# Altium PCB PCB1.PcbDoc (part 1 of 2)
Units mm, origin at the board's own origin, x right, y up, seen from the top; angles counter-clockwise.
Board outline 128 x 71 mm, 2 copper layers (Top Layer, Bottom Layer); 104 components, 107 nets, 531 pads, 522 vias.
Unrouted connection lines stored in the file: 53.
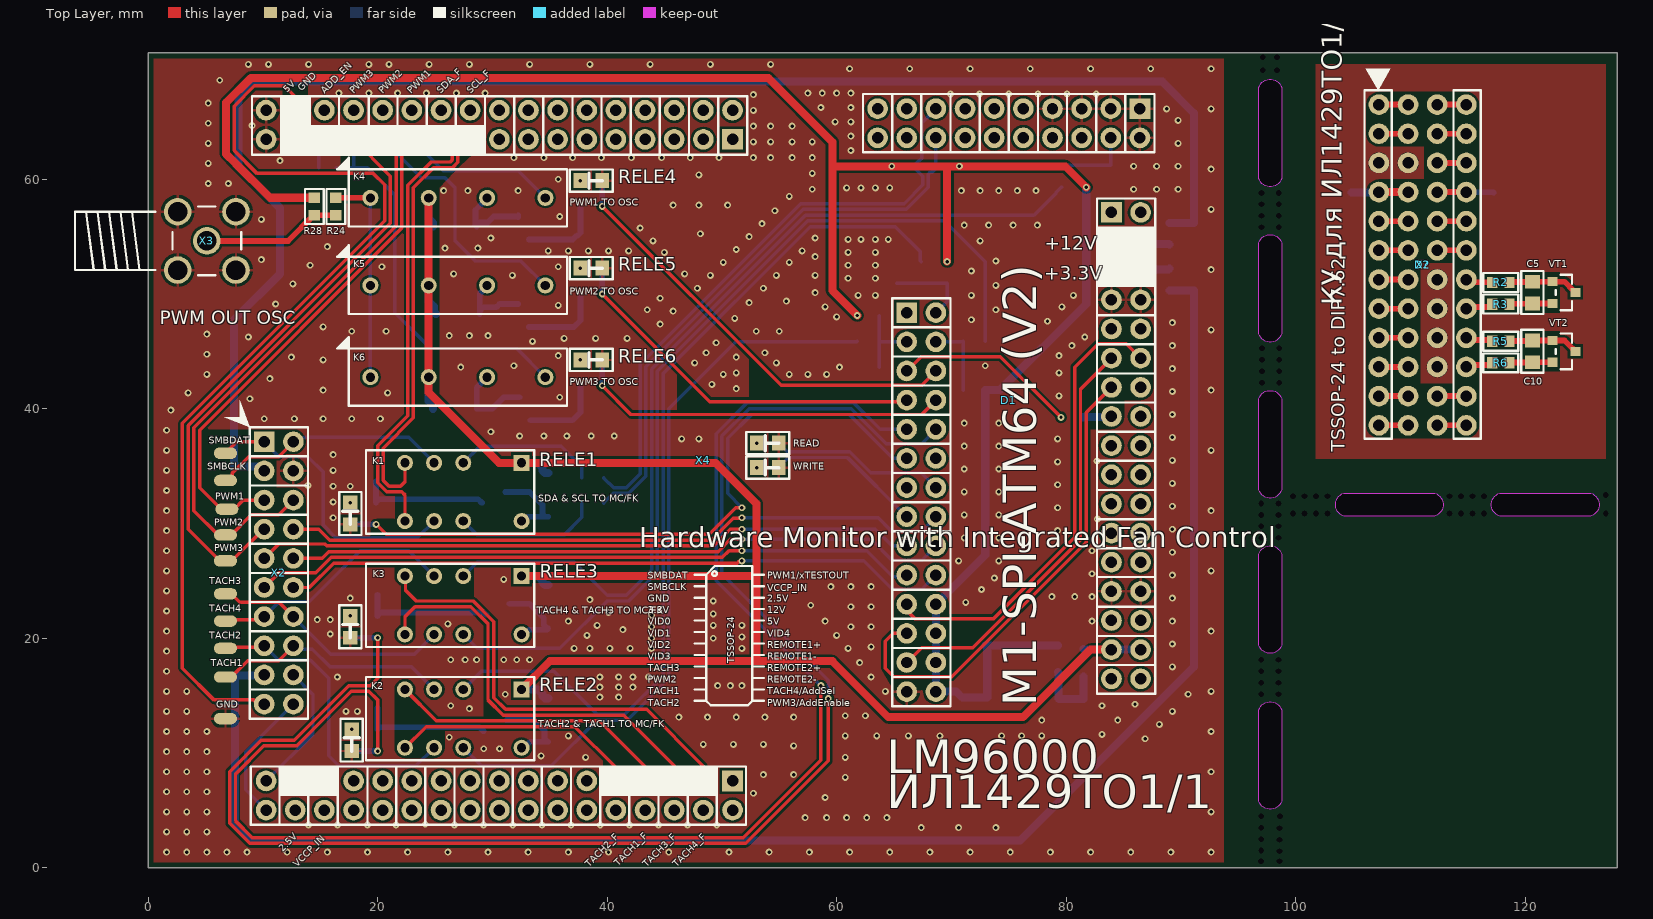
[diagram p0: Top Layer view]
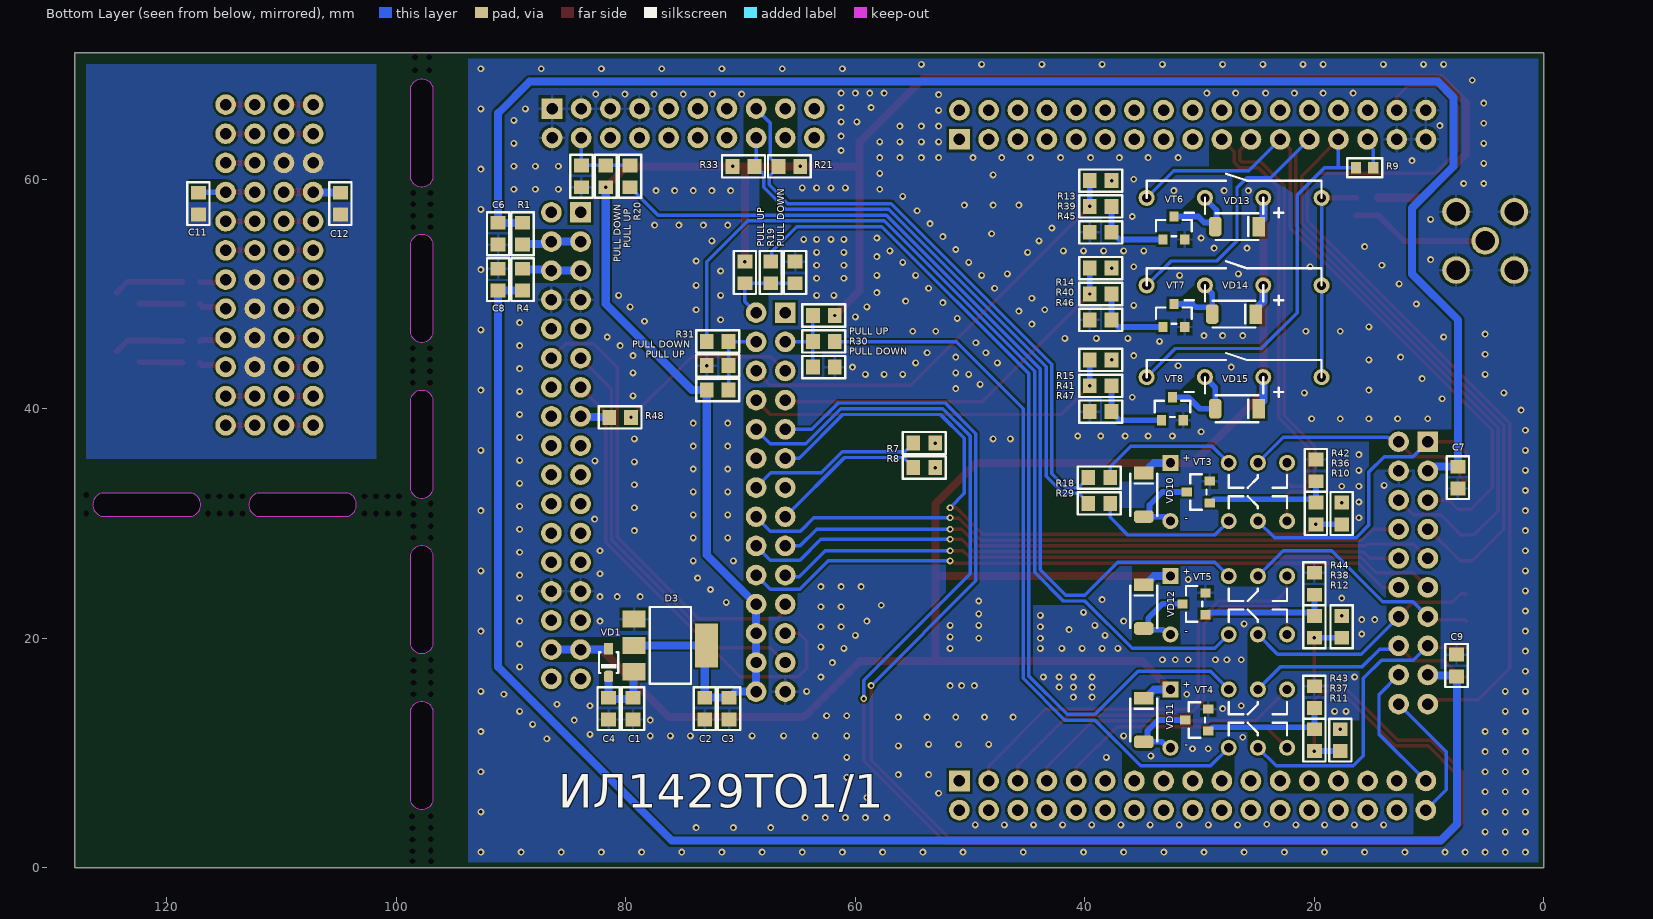
[diagram p1: Bottom Layer view, seen from below]

## Layer stack, top to bottom
Top Solder: solder mask 0.0102, Solder Resist, Dk 3.5
Top Layer: signal copper 0.0356
Dielectric 1: dielectric 0.32, FR-4, Dk 4.8
Bottom Layer: signal copper 0.0356
Bottom Solder: solder mask 0.0102, Solder Resist, Dk 3.5

## Board outline
0,0 128,0 128,71 0,71
cut-out: 125.717,32.643 cw(c125.375,31.643) 125.717,30.643 117.773,30.643 cw(c118.115,31.643) 117.773,32.643
cut-out: 112.127,32.643 cw(c111.785,31.643) 112.127,30.643 104.182,30.643 cw(c104.524,31.643) 104.182,32.643
cut-out: 98.778,19.398 cw(c97.778,19.74) 96.778,19.398 96.778,27.342 cw(c97.778,27) 98.778,27.342
cut-out: 98.778,5.807 cw(c97.778,6.149) 96.778,5.807 96.778,13.752 cw(c97.778,13.41) 98.778,13.752
cut-out: 98.778,32.932 cw(c97.778,33.274) 96.778,32.932 96.778,40.877 cw(c97.778,40.535) 98.778,40.877
cut-out: 98.778,60.057 cw(c97.778,60.399) 96.778,60.057 96.778,68.002 cw(c97.778,67.66) 98.778,68.002
cut-out: 98.778,46.523 cw(c97.778,46.865) 96.778,46.523 96.778,54.467 cw(c97.778,54.125) 98.778,54.467

## Design rules (kind name [scope] priority, off if disabled: settings)
Clearance [All] p1: gap=0.2 ignorepadtopadclearanceinfootprint=FALSE except(0: Arc-Hole Track-Hole SMDPad-Hole THPad-Hole Via-Hole Fill-Hole Poly-Hole Region-Hole Text-Hole)
ComponentClearance [All] p1: gap=0 collisioncheckmode=3 verticalgap=0 showdistances=FALSE
PolygonConnect [InNet('GND')] p1: thpad.connectstyle=Relief thpad.reliefconductorwidth=0.254 thpad.reliefentries=4 thpad.polygonreliefangle="90 Angle" thpad.airgapwidth=0.254 smdpad.connectstyle=Relief smdpad.reliefconductorwidth=0.254 smdpad.reliefentries=4 smdpad.polygonreliefangle="90 Angle" smdpad.airgapwidth=0.254 via.connectstyle=Direct via.reliefconductorwidth=0.254 via.reliefentries=4 via.polygonreliefangle="90 Angle" via.airgapwidth=0.254
RoutingVias [All] p1: holewidth=0.3 width=0.6 viastyle="Through Hole" minholewidth=0.3 minwidth=0.6 maxholewidth=0.6 maxwidth=1.2
SilkToSilkClearance [All] p1: silktosilkclearance=0
SilkToSolderMaskClearance [IsPad] p1: minsilkscreentomaskgap=0 clearancetoexposedcopper=TRUE
SolderMaskExpansion [All] p1: expansion=0.102 istentingtop=FALSE
Width [All] p1: maxlimit=0.7 minlimit=0.2 preferedwidth=0.3
27 further rules are at their usual default settings.

## Classes and differential pairs
component class UCP_s26: R48 X4
component class UCP_s25: K1 K2 K3 K4 K5 K6 R18 R19 R20 R21 R24 R27 R28 R29 R30 R31 R33 R34 R36 R37 R38 R39 R40 R41 R42 R43 R44 R45 R46 R47 s VD10 VD11 VD12 VD13 VD14 VD15 VT3 VT4 VT5 VT6 VT7 VT8
component class Sheet1: C1 C2 C3 C4 C5 C6 C7 C8 C9 C10 C11 C12 D1 D2 D3 KP1 KP2 KP3 KP4 KP5 KP6 KP7 KP8 KP9 KP10 R1 R2 R3 R4 R5 R6 R7 R8 R9 R10 R11 R12 R13 R14 R15 VD1 VD2 VD3 VD4 VD5 VD6 VD7 VD8 VD9 VT1 VT2 X1 X2 X3

## Components (designator, comment, footprint, x,y, rotation, side; value= is the part's Value field where it differs from the comment)
C1 "10uF" 0805 79.375,13.875 r270 bottom
C2 "0.1uF" 0805 73.125,13.875 r270 bottom
C3 "10uF" 0805 71,13.875 r270 bottom
C4 "0.1uF" 0805 81.5,13.875 r270 bottom
C5 "100pF" 0805 120.625,50.125 r270 top
C6 "10uF" 0805 91.125,55.25 r270 bottom
C7 "0.1uF" 0805 7.5,34 r270 bottom
C8 "10uF" 0805 91.125,51.25 r90 bottom
C9 "0.1uF" 0805 7.625,17.625 r90 bottom
C10 "100pF" 0805 120.625,45 r270 top
C11 "0.1uF" 0805 117.25,57.875 r270 bottom
C12 "0.1uF" 0805 104.875,57.875 r270 bottom
D1 "M1-SPI-ATM64(V2)" M1-SPI-ATM64(V2) 75,40.75 r270 top locked
D2 "LM96000" "TSSOP-24 DIP-7.62" 107.25,66.5 r0 top
D3 "LDO" SOT-223 76.125,19.375 r270 bottom
GND "Contact" Contact 6.75,13 r180 top (schematic designator KP6)
K1 "V23079A1001B301 TE" V23079A1001B301 26.25,32.75 r180 top locked
K2 "V23079A1001B301 TE" V23079A1001B301 26.25,13 r180 top locked
K3 "V23079A1001B301 TE" V23079A1001B301 26.25,22.875 r180 top locked
K4 "TRR1A05F00" TRR1A05F00 27,58.375 r0 top
K5 "TRR1A05F00" TRR1A05F00 27,50.75 r0 top
K6 "TRR1A05F00" TRR1A05F00 27,42.75 r0 top
"PULL DOWN" "DNP" 0805 72,43.75 r180 bottom (schematic designator R35)
"PULL DOWN" "DNP" 0805 62.75,43.625 r0 bottom (schematic designator R34)
"PULL DOWN" "DNP" 0805 83.875,60.25 r90 bottom (schematic designator R23)
"PULL DOWN" "DNP" 0805 65.25,51.875 r270 bottom (schematic designator R22)
"PULL UP" "DNP" 0805 72,41.625 r0 bottom (schematic designator R27)
"PULL UP" "DNP" 0805 62.75,48.125 r180 bottom (schematic designator R26)
"PULL UP" "DNP" 0805 81.75,60.25 r270 bottom (schematic designator R17)
"PULL UP" "DNP" 0805 69.625,51.875 r90 bottom (schematic designator R16)
PWM1 "Contact" Contact 6.875,31.25 r180 top (schematic designator KP3)
PWM2 "Contact" Contact 6.75,29 r180 top (schematic designator KP4)
PWM3 "Contact" Contact 6.75,26.75 r180 top (schematic designator KP5)
R1 "1" 0805 89,55.25 r90 bottom
R2 "SOLDER" 0603 117.875,51 r180 top
R3 "SOLDER" 0603 117.875,49.125 r180 top
R4 "1" 0805 89,51.25 r270 bottom
R5 "SOLDER" 0603 117.875,45.875 r180 top
R6 "SOLDER" 0603 117.875,44 r180 top
R7 "2.2k" 0805 54,37 r180 bottom
R8 "2.2k" 0805 54,34.875 r180 bottom
R9 "10k" 0603 15.625,61 r180 bottom
R10 "2.2k" 0805 17.625,30.875 r90 bottom
R11 "2.2k" 0805 17.75,11.125 r90 bottom
R12 "2.2k" 0805 17.625,21 r90 bottom
R13 "2.2k" 0805 38.625,59.875 r180 bottom
R14 "2.2k" 0805 38.625,52.25 r180 bottom
R15 "2.2k" 0805 38.625,44.25 r180 bottom
R18 "100" 0805 38.75,34 r0 bottom
R19 "100" 0805 67.375,51.875 r270 bottom
R20 "100" 0805 79.625,60.25 r90 bottom
R21 "10k" 0805 65.75,61.125 r180 bottom
R24 "100" 0603 16.375,57.625 r90 top
R28 "10k" 0603 14.5,57.625 r270 top
R29 "100" 0805 38.75,31.75 r0 bottom
R30 "100" 0805 62.75,45.875 r0 bottom
R31 "100" 0805 72,45.875 r180 bottom
R33 "10k" 0805 69.75,61.125 r0 bottom
R36 "1k" 0805 19.875,30.875 r90 bottom
R37 "1k" 0805 20,11.125 r90 bottom
R38 "1k" 0805 20,21 r90 bottom
R39 "1k" 0805 38.625,57.625 r180 bottom
R40 "1k" 0805 38.625,50 r180 bottom
R41 "1k" 0805 38.625,42 r180 bottom
R42 "20k" 0805 19.875,34.625 r90 bottom
R43 "20k" 0805 20,14.875 r90 bottom
R44 "20k" 0805 20,24.75 r90 bottom
R45 "20k" 0805 38.625,55.375 r0 bottom
R46 "20k" 0805 38.625,47.75 r0 bottom
R47 "20k" 0805 38.625,39.75 r0 bottom
R48 "100" 0805 80.5,39.25 r0 bottom
READ "LED(0805)" 0805(LED) 54,37 r0 top (schematic designator VD2)
RELE1 "LED(0805)" 0805(LED) 17.625,30.875 r270 top (schematic designator VD4)
RELE2 "LED(0805)" 0805(LED) 17.75,11.125 r270 top (schematic designator VD5)
RELE3 "LED(0805)" 0805(LED) 17.625,21 r270 top (schematic designator VD6)
RELE4 "LED(0805)" 0805(LED) 38.625,59.875 r0 top (schematic designator VD7)
RELE5 "LED(0805)" 0805(LED) 38.625,52.25 r0 top (schematic designator VD8)
RELE6 "LED(0805)" 0805(LED) 38.625,44.25 r0 top (schematic designator VD9)
SMBCLK "Contact" Contact 6.75,33.75 r180 top (schematic designator KP2)
SMBDAT "Contact" Contact 6.75,36.125 r180 top (schematic designator KP1)
TACH1 "Contact" Contact 6.75,16.625 r180 top (schematic designator KP7)
TACH2 "Contact" Contact 6.75,19.125 r180 top (schematic designator KP8)
TACH3 "Contact" Contact 6.75,23.875 r180 top (schematic designator KP9)
TACH4 "Contact" Contact 6.75,21.5 r180 top (schematic designator KP10)
VD1 "BAT20JFILM (SOD323)" SOD323 81.5,17.875 r90 bottom
VD10 "LL4148 NXP" SOD80C 34.875,32.5 r90 bottom
VD11 "LL4148 NXP" SOD80C 34.875,12.875 r90 bottom
VD12 "LL4148 NXP" SOD80C 34.875,22.75 r90 bottom
VD13 "LL4148 NXP" SOD80C 26.75,55.875 r180 bottom
VD14 "LL4148 NXP" SOD80C 27,48.25 r180 bottom
VD15 "LL4148 NXP" SOD80C 26.75,40 r180 bottom
VT1 "MMBT3904L*G ONS" SOT-23 123.375,50.125 r270 top
VT2 "MMBT3904L*G ONS" SOT-23 123.375,45 r270 top
VT3 "MMBT5551L" SOT-23 30.125,32.75 r90 bottom
VT4 "MMBT5551L" SOT-23 30.25,12.875 r90 bottom
VT5 "MMBT5551L" SOT-23 30.5,23 r90 bottom
VT6 "MMBT5551L" SOT-23 32.25,55.75 r180 bottom
VT7 "MMBT5551L" SOT-23 32.25,48.125 r180 bottom
VT8 "MMBT5551L" SOT-23 32.375,40 r180 bottom
WRITE "LED(0805)" 0805(LED) 54,34.875 r0 top (schematic designator VD3)
X2 "PLD20-2,54" PLD20-2,54 10.125,37.125 r270 top locked
X3 "KLS1-SMA002-B" KLS1-SMA002-B 5.125,54.625 r90 top
X4 "FORMULA" FORMULA 38.75,34.25 r0 top locked
X? "PBD-24" PBD-24 109.79,66.5 r0 top

## Footprints (in the part's own frame and the unit in brackets; to place one, negate y for a bottom-side part, rotate by r counter-clockwise, add the part's x,y. Pads: shape width x height; smd on the part's side, far side on the other; paste and mask are expansions set on the pad)
0603 [mm]
  rect 0.9x1 smd: 1(-0.76,0) 2(0.76,0)
  silkscreen extent -1.53,-0.82 1.53,0.82, body extent -0.8,-0.4 0.8,0.4, height 0.45
0805 [mm]
  rect 1.2x1.3 smd: 1(-0.95,0) 2(0.95,0)
  silkscreen extent -1.87,-0.97 1.87,0.97, body extent -1.05,-0.63 0.95,0.63, height 0.55
0805(LED) [mm]
  rect 1.2x1.3 smd: 1(-0.95,0) 2(0.95,0)
  silkscreen extent -1.87,-0.97 1.87,0.97, body extent -1.03,-0.41 1.03,0.5, height 0.85
Contact [mm]
  oval 2x1 smd: 1(0,0)
FORMULA [mm]
  rect 1.8x1.8 hole 1: 1(12.18,29.22) VDDF(12.18,-26.68) VEEF(45.2,22.86)
  round 1.8 hole 1: 2(9.64,29.22) 3(7.1,29.22) 4(4.56,29.22) 5(2.02,29.22) 6(-0.52,29.22) 7(-3.06,29.22) 8(-5.6,29.22) 9(-8.14,29.22) 10(-10.68,29.22) 11(-13.22,29.22) 12(-15.76,29.22) 13(-18.3,29.22) 14(-20.84,29.22) 15(-23.38,29.22) 16(-25.92,29.22) 17(12.18,31.76) 18(9.64,31.76) 19(7.1,31.76) 20(4.56,31.76) 21(2.02,31.76) 22(-0.52,31.76) 23(-3.06,31.76) 24(-5.6,31.76) 25(-8.14,31.76) 26(-10.68,31.76) 27(-13.22,31.76) 28(-15.76,31.76) 29(-18.3,31.76) 30(-20.84,31.76) 31(-23.38,31.76) 32(-25.92,31.76) 33(-28.46,-29.22) 34(-25.92,-29.22) 35(-23.38,-29.22) 36(-20.84,-29.22) 37(-18.3,-29.22) 38(-15.76,-29.22) 39(-13.22,-29.22) 40(-10.68,-29.22) 41(-8.14,-29.22) 42(-5.6,-29.22) 43(-3.06,-29.22) 44(-0.52,-29.22) 45(2.02,-29.22) 46(4.56,-29.22) 47(7.1,-29.22) 48(9.64,-29.22) 49(-28.46,-26.68) 50(-25.92,-26.68) 51(-23.38,-26.68) 52(-20.84,-26.68) 53(-18.3,-26.68) 54(-15.76,-26.68) 55(-13.22,-26.68) 56(-10.68,-26.68) 57(-8.14,-26.68) 58(-5.6,-26.68) 59(-3.06,-26.68) 60(-0.52,-26.68) 61(2.02,-26.68) 62(4.56,-26.68) 63(7.1,-26.68) 64(9.64,-26.68) +5V(45.2,-15.24) +5V(47.74,-15.24) +5V_VCCF(45.2,20.32) +5V_VCCS(47.74,20.32) +5V_VDDF(45.2,17.78) +5V_VDDS(47.74,17.78) +12V(45.2,-12.7) +12V(47.74,-12.7) -12V(45.2,-17.78) -12V(47.74,-17.78) GND(-28.46,29.22) GND(-28.46,31.76) GND(45.2,-10.16) GND(45.2,15.24) GND(47.74,-10.16) GND(47.74,15.24) IN-OUT1(47.74,10.16) IN-OUT2(47.74,7.62) IN-OUT3(47.74,5.08) IN-OUT4(47.74,2.54) IN-OUT5(47.74,0) IN-OUT6(47.74,-2.54) IN-OUT7(47.74,-5.08) IN-OUT8(47.74,-7.62) NC(45.2,12.7) NC(47.74,12.7) OUT1(45.2,10.16) OUT2(45.2,7.62) OUT3(45.2,5.08) OUT4(45.2,2.54) OUT5(45.2,0) OUT6(45.2,-2.54) OUT7(45.2,-5.08) OUT8(45.2,-7.62) VDDS(12.18,-29.22) VEES(47.74,22.86)
  silkscreen extent -29.8,-30.51 49.02,32.97, body extent -29.79,-30.4 48.98,32.92, height 3
KLS1-SMA002-B [mm]
  round 2.4 hole 1.7: 1(0,0) 2(-2.54,-2.54) 2(-2.54,2.54) 2(2.54,-2.54) 2(2.54,2.54)
  silkscreen extent -3,-3 3,11.49, body extent -3.5,-3.5 3.5,11.65, height 10
M1-SPI-ATM64(V2) [mm]
  rect 1.8x1.8 hole 1: 1X2(-25.4,11.43) 1X3(-7.62,-8.89)
  round 1.8 hole 1: 2X2(-22.86,11.43) 2X3(-7.62,-6.35) 3X2(-25.4,8.89) 3X3(-5.08,-8.89) 4X2(-22.86,8.89) 4X3(-5.08,-6.35) 5X2(-25.4,6.35) 5X3(-2.54,-8.89) 6X2(-22.86,6.35) 6X3(-2.54,-6.35) 7X2(-25.4,3.81) 7X3(0,-8.89) 8X2(-22.86,3.81) 8X3(0,-6.35) 9X2(-25.4,1.27) 9X3(2.54,-8.89) 10X2(-22.86,1.27) 10X3(2.54,-6.35) 11X2(-25.4,-1.27) 11X3(5.08,-8.89) 12X2(-22.86,-1.27) 12X3(5.08,-6.35) 13X2(-25.4,-3.81) 13X3(7.62,-8.89) 14X2(-22.86,-3.81) 14X3(7.62,-6.35) 15X2(-25.4,-6.35) 15X3(10.16,-8.89) 16X2(-22.86,-6.35) 16X3(10.16,-6.35) 17X2(-25.4,-8.89) 17X3(12.7,-8.89) 18X2(-22.86,-8.89) 18X3(12.7,-6.35) 19X2(-25.4,-11.43) 19X3(15.24,-8.89) 20X2(-22.86,-11.43) 20X3(15.24,-6.35) 21X3(17.78,-8.89) 22X3(17.78,-6.35) 23X3(20.32,-8.89) 24X3(20.32,-6.35) 25X3(22.86,-8.89) 26X3(22.86,-6.35) 27X3(25.4,-8.89) 28X3(25.4,-6.35)
  silkscreen extent -26.67,-12.7 26.67,12.7
PBD-24 [mm]
  round 1.8 hole 1: 1(0,0) 2(0,-2.54) 3(0,-5.08) 4(0,-7.62) 5(0,-10.16) 6(0,-12.7) 7(0,-15.24) 8(0,-17.78) 9(0,-20.32) 10(0,-22.86) 11(0,-25.4) 12(0,-27.94) 13(2.54,-27.94) 14(2.54,-25.4) 15(2.54,-22.86) 16(2.54,-20.32) 17(2.54,-17.78) 18(2.54,-15.24) 19(2.54,-12.7) 20(2.54,-10.16) 21(2.54,-7.62) 22(2.54,-5.08) 23(2.54,-2.54) 24(2.54,0)
PLD20-2,54 [mm]
  rect 1.8x1.8 hole 1: 1(0,0)
  round 1.8 hole 1: 2(0,2.54) 3(2.54,0) 4(2.54,2.54) 5(5.08,0) 6(5.08,2.54) 7(7.62,0) 8(7.62,2.54) 9(10.16,0) 10(10.16,2.54) 11(12.7,0) 12(12.7,2.54) 13(15.24,0) 14(15.24,2.54) 15(17.78,0) 16(17.78,2.54) 17(20.32,0) 18(20.32,2.54) 19(22.86,0) 20(22.86,2.54)
  silkscreen extent -1.27,-1.27 24.13,3.81, body extent -1.27,-1.23 24.13,3.77, height 8.4
SOD80C [mm]
  rrect50% 1.1x1.7 smd: 1(-1.9,0)
  rect 1.1x1.7 smd: 2(1.9,0)
  silkscreen extent -1.85,-1.17 1.85,1.17, body extent -1.9,-0.8 1.8,0.8, height 1.55
SOD323 [mm]
  rect 1x0.8 smd: 1(1.2,0)
  rrect50% 1x0.8 smd: 2(-1.2,0)
  silkscreen extent -0.9,-0.84 0.9,0.84, body extent -1.41,-0.67 1.19,0.67, height 1.1
SOT-23 [mm]
  rect 0.8x0.9 smd: 1(-0.95,-1) 1(-0.95,-1) 2(0.95,-1) 2(0.95,-1) 3(0,1) 3(0,1)
  silkscreen extent -1.55,-0.72 1.55,0.7, body extent -1.5,-1.25 1.5,1.25, height 1.05
SOT-223 [mm]
  rect 1.5x2 smd: 1(-2.3,-3.15) 2(0,-3.15) 3(2.3,-3.15)
  rect 3.8x2 smd: 2(0,3.15)
  silkscreen extent -3.35,-1.79 3.35,1.81, body extent -3.25,-3.48 3.25,3.48, height 1.4
TRR1A05F00 [mm]
  round 1.4 hole 0.8: 1(-7.62,0) 3(-2.54,0) 5(2.54,0) 7(7.62,0)
  silkscreen extent -9.5,-2.5 9.5,2.5, body extent -9.47,-2.64 9.53,2.39, height 7.64
"TSSOP-24 DIP-7.62" [mm]
  round 1.8 hole 1: 1(0,0) 2(0,-2.54) 3(0,-5.08) 4(0,-7.62) 5(0,-10.16) 6(0,-12.7) 7(0,-15.24) 8(0,-17.78) 9(0,-20.32) 10(0,-22.86) 11(0,-25.4) 12(0,-27.94) 13(7.62,-27.94) 14(7.62,-25.4) 15(7.62,-22.86) 16(7.62,-20.32) 17(7.62,-17.78) 18(7.62,-15.24) 19(7.62,-12.7) 20(7.62,-10.16) 21(7.62,-7.62) 22(7.62,-5.08) 23(7.62,-2.54) 24(7.62,0)
  body extent -1.25,-29.46 8.87,1.52, height 8.5
V23079A1001B301 [mm]
  rect 1.4x1.4 hole 0.8: 1(-6.3,-2.54)
  round 1.4 hole 0.8: 3(-1.22,-2.54) 4(1.32,-2.54) 5(3.86,-2.54) 8(3.86,2.54) 9(1.32,2.54) 10(-1.22,2.54) 12(-6.3,2.54)
  silkscreen extent -7.4,-3.63 7.25,3.63, body extent -7.25,-3.6 7.25,3.6, height 9.4

## Part data
C1 C2 C3 C4 C5 C6 C7 C8 C9 C10 C11 C12: library part C0805, ComponentHeigt=1.3, Firme=AVX, KIND=Конденсатор, Leadform=SMD, Packaging=0805
D3: library part "AMS1117-3.3 (SOT-223)"
"PULL DOWN" "PULL DOWN" "PULL DOWN" "PULL DOWN" "PULL UP" "PULL UP" "PULL UP" "PULL UP" R1 R4 R7 R8 R10 R11 R12 R13 R14 R15 R18 R19 R20 R21 R29 R30 R31 R33 R36 R37 R38 R39 R40 R41 R42 R43 R44 R45 R46 R47 R48: library part "R0805 Yageo", ComponentHeigt=0.6, Firme=Yageo, KIND=Резистор, Leadform=SMD, Packaging=0805
R2 R3 R5 R6 R9 R24 R28: library part "R0603 Yageo", ComponentHeigt=0.5, Firme=Yageo, KIND=Резистор, Leadform=SMD, Packaging=0402
X2: "Посадочное место для проводов на ТО", ComponentHeigt=5.5, Name=Вилка, Specification="Вилка PLD2-2 *", Typ=PLD2-2
D1 X3: ComponentHeigt=5.5, Name=Вилка, Specification="Вилка PLD2-2 *", Typ=PLD2-2
READ RELE1 RELE2 RELE3 RELE4 RELE5 RELE6 VD1 WRITE: ComponentHeigt=0.75, Firme=Kingbright, KIND="Светодиод L-1154GD Kingbright", Leadform="в отверстия", NN=24003000
VD10 VD11 VD12 VD13 VD14 VD15: Component Link=http://www.nxp.com, ComponentHeigt=1.6, Firme=NXP, KIND="Диод LL4148 NXP", Leadform=SMD, NN=24009301, Packaging=SOD-80C
VT1 VT2: ComponentHeigt=1.1, Firme=ONS, KIND="Транзистор MMBT3904L*G ONS", Leadform=SMD, NN=24006226, Packaging=SOT-23
VT3 VT4 VT5 VT6 VT7 VT8: ComponentHeigt=1.1, Firme=ONS, KIND="Транзистор MMBT5551L*G ONS", Leadform=SMD, NN=24007468, Packaging=SOT-23

## Free pads (board coordinates)
  round 0 hole 0.5 unplated: 38(98.375,69.5) 38(98.375,70.625) 38(98.5,17.125) 38(98.5,30.75) 38(98.527,57.807) 38(98.564,44.273) 38(98.598,3.443) 38(100.774,32.365) 38(114.399,32.365) 39(98.5,18.125) 39(98.5,31.75) 39(98.527,58.807) 39(98.564,45.273) 39(98.625,4.5) 39(99.774,32.365) 39(113.399,32.365) 39(127.024,32.49) 41(97,2.5) 41(97,3.5) 41(97,16.125) 41(97,17.125) 41(97,29.75) 41(97,30.75) 41(97.027,56.807) 41(97.027,57.807) 41(97.064,43.273) 41(97.064,44.273) 41(97.125,69.5) 41(97.125,70.625) 41(100.774,30.865) 41(101.774,30.865) 41(114.399,30.865) 41(115.399,30.865) 42(97,4.5) 42(97,18.125) 42(97,31.75) 42(97.027,58.807) 42(97.064,45.273) 42(99.774,30.865) 42(113.399,30.865) 42(127.024,30.865) 43(96.973,0.568) 43(97,1.5) 43(97,15.125) 43(97,28.75) 43(97.027,55.807) 43(97.064,42.273) 43(98.5,15.125) 43(98.5,16.125) 43(98.5,28.75) 43(98.5,29.75) 43(98.527,55.807) 43(98.527,56.807) 43(98.564,42.273) 43(98.564,43.273) 43(98.598,0.568) 43(98.598,1.443) 43(98.598,2.443) 43(101.774,32.365) 43(102.774,30.865) 43(102.774,32.365) 43(115.399,32.365) 43(116.399,30.865) 43(116.399,32.365)

## Via types
v1: diameter 0.6, hole 0.3, Top Layer to Bottom Layer, tented both sides, 522 vias

## Nets (pads, with @x,y where several pads share a name; then routed paths per layer and width w, separated by ;. In a path a pad name is that pad's centre, name@x,y a point inside that pad or via, vN(x,y) a via of type N, cw(c..) or ccw(c..) an arc to the next point about the centre after c; other vN are vias at no path point)
2.5V: X2.20 X4.33 | length 11.7
  Bottom Layer w0.3: X4.33@10.29,5.03 8.5,6.82 8.5,10.1 X2.20@12.665,14.265
2.5V_LM: D2.22 X?.22 | length 2.5
  Top Layer w0.5: X?.22@112.33,61.42 D2.22@114.87,61.42
3.3V: C8.1 C9.1 R4.2 X2.17 | length 140.8
  Bottom Layer w0.7: C9.1@7.575,16.675 7.575,3.8 9,2.375 76,2.375 91.125,17.5 C8.1@91.125,50.3 R4.2@89,50.3 ; C9.1@7.625,16.675 7.69,16.74 10.06,16.74 X2.17@10.125,16.805
3.3V_LM: C12.1 D2.4 X?.4 | length 4.9
  Top Layer w0.7: D2.4@107.25,58.88 X?.4@109.79,58.88
  Bottom Layer w0.7: C12.1@104.875,58.825 104.903,58.852 107.222,58.852 D2.4@107.25,58.88
5V: X2.19 X4.32 | length 83.8
  Top Layer w0.3: X2.19@10.125,14.265 9.838,14.552 9.272,14.552 9.199,14.625 5.75,14.625 3,17.375 3,38.746 20.625,56.371 20.625,59.5 19.625,60.5 9.5,60.5 7.5,62.5 7.5,66.375 9.25,68.125 11.87,68.125 12.811,67.184 12.811,66.029 X4.32@12.83,66.01
  Bottom Layer w0.5: X2.19@10.125,14.265 X2.19@10.208,14.182
5V_LM: D2.20 X?.20 | length 2.5
  Top Layer w0.5: X?.20@112.33,56.34 D2.20@114.87,56.34
12V: C6.1 C7.1 R1.2 X2.3 | length 134.7
  Bottom Layer w0.7: X2.3@10.125,34.585 9.827,34.585 9.462,34.95 C7.1@7.5,34.95 7.5,47.75 11.5,51.75 11.5,57.5 7.875,61.125 7.875,67.125 9.25,68.5 88.375,68.5 91.125,65.75 C6.1@91.125,56.2 R1.2@89,56.2
12V_LM: C11.1 D2.21 X?.21 | length 4.9
  Top Layer w0.5: X?.21@112.33,58.88 D2.21@114.87,58.88
  Bottom Layer w0.5: D2.21@114.87,58.88 114.897,58.852 117.222,58.852 C11.1@117.25,58.825
+3.3V_MC: "PULL UP.2" C2.1 C3.1 D1.22X3 D1.24X3 D1.26X3 D1.28X3 D3.2 R21.2 R28.1 R33.2 | length 182.7
  Top Layer w0.7: R28.1@14.5,58.385 10.615,58.385 7.625,61.375 7.625,61.385 6.8,62.21 6.8,66.665 8.96,68.825 54.05,68.825 59.625,63.25 59.625,61.125 ; v1(61.8,48.125) 59.625,50.3 59.625,61.125 ; v1(69.625,52.825) 69.625,61.125 ; v1(81.75,59.3) 79.925,61.125 v1(70.7,61.125) 69.625,61.125 ; 59.625,61.125 v1(64.8,61.125) 69.625,61.125
  Bottom Layer w0.7: D3.2@79.275,19.375 D3.2@72.975,19.375 73.125,19.225 C2.1@73.125,14.825 C3.1@71,14.825 70.95,14.825 70.425,15.35 D1.28X3@68.65,15.35 D1.26X3@68.65,17.89 D1.24X3@68.65,20.43 D1.22X3@68.65,22.97 72.95,27.27 72.95,41.625 74.25,41.625 81.75,49.125 v1(81.75,59.3)
+3.3V_VDD: R4.1 X4.+5V_VDDF X4.+5V_VDDS | length 5.1
  Bottom Layer w0.7: X4.+5V_VDDF@83.96,52.04 X4.+5V_VDDF@83.95,52.03 X4.+5V_VDDS@86.49,52.03 86.575,52.115 88.915,52.115 R4.1@89,52.2
+5V_CONST: K1.1 K2.1 K3.1 K4.3 K5.3 K6.3 VD1.1 VD10.2 VD11.2 VD12.2 VD13.2 VD14.2 VD15.2 X4.+5V | length 162.3
  Top Layer w0.7: K4.3@24.46,58.375 K5.3@24.46,50.75 K6.3@24.46,42.75 24.46,41.415 30.585,35.29 K1.1@32.55,35.29 49.46,35.29 53,31.75 53,25.5 ; K2.1@32.55,15.54 35.01,18 53,18 ; K3.1@32.55,25.415 52.915,25.415 53,25.5 ; X4.+5V@83.95,19.01 82.135,19.01 76.25,13.125 64.5,13.125 59.625,18 53,18 ; 53,18 53,25.5
  Bottom Layer w0.7: K6.3@24.46,42.75 24.46,40.69 24.85,40.3 VD15.2@24.85,40 ; K5.3@24.46,50.75 24.46,49.35 24.9,48.91 24.9,48.45 VD14.2@25.1,48.25 ; K4.3@24.46,58.375 24.46,56.565 24.85,56.175 VD13.2@24.85,55.875 ; K2.1@32.55,15.54 33.965,15.54 34.375,15.13 34.375,14.975 34.575,14.775 VD11.2@34.875,14.775 ; K3.1@32.55,25.415 33.965,25.415 34.375,25.005 34.375,24.85 34.575,24.65 VD12.2@34.875,24.65 ; K1.1@32.55,35.29 33.965,35.29 34.375,34.88 34.375,34.6 34.575,34.4 VD10.2@34.875,34.4 ; VD1.1@81.5,19.075 81.5,19.06 81.55,19.01 X4.+5V@83.95,19.01 X4.+5V@86.49,19.01
+12V_VCC: R1.1 X4.+5V_VCCF X4.+5V_VCCS | length 5.2
  Bottom Layer w0.7: X4.+5V_VCCF@83.95,54.57 X4.+5V_VCCS@86.49,54.57 86.7,54.36 87.714,54.36 87.719,54.354 88.946,54.354 R1.1@89,54.3
ADDRESS_ENABLE: R9.2 X4.15 | length 2.7
  Bottom Layer w0.3: R9.2@14.865,61 14.865,62.613 15.37,63.118 X4.15@15.37,63.47
DI1_MC: D1.21X3 X4.IN-OUT1 | length 40.3
  Top Layer w0.3: D1.21X3@66.11,22.97 66.397,22.683 66.397,22.132 66.809,21.72 73.681,21.72 80.75,28.789 80.75,43.625 82.785,45.66 85.24,45.66 X4.IN-OUT1@86.49,44.41
DO1_MC: D1.25X3 X4.OUT1 | length 36.5
  Top Layer w0.3: D1.25X3@66.11,17.89 67.4,19.18 71.848,19.18 81.25,28.582 81.25,41.71 X4.OUT1@83.95,44.41
DO2_MC: D1.23X3 X4.OUT2 | length 41.6
  Top Layer w0.3: D1.23X3@66.11,20.43 64.93,20.43 64.25,19.75 64.25,17.375 64.985,16.64 70.015,16.64 81.75,28.375 81.75,39.67 X4.OUT2@83.95,41.87
GND: "PULL DOWN.1" C1.2 C2.2 C3.2 C4.2 C6.2 C7.2 C8.2 C9.2 D1.1X2 D1.2X2 D1.3X2 D1.5X2 D1.7X2 D1.27X3 D3.1 GND.1 R42.2 R43.2 R44.2 R45.2 R46.2 R47.2 READ.2 RELE1.2 RELE2.2 RELE3.2 RELE4.2 RELE5.2 RELE6.2 VT3.2 VT4.2 VT5.2 VT6.2 VT7.2 VT8.2 WRITE.2 X2.4 X3.2 X4.16 X4.GND | length 0.2
  Bottom Layer w0.7: X2.4@12.665,34.585 X2.4@12.785,34.705
  other v1: 1.625,1.375 3.375,1.375 5.125,1.375 6.875,1.375 8.625,1.375 12.125,1.375 15.625,1.375 19.125,1.375 22.625,1.375 26.125,1.375 29.625,1.375 33.125,1.375 36.625,1.375 40.125,1.375 45.375,1.375 50.625,1.375 54.125,1.375 57.625,1.375 61.125,1.375 64.625,1.375 68.125,1.375 71.625,1.375 75.125,1.375 78.625,1.375 82.125,1.375 85.625,1.375 89.125,1.375 92.625,1.375 1.625,3.125 3.375,3.125 5.125,3.125 67.375,3.5 70.625,3.5 73.875,3.5 13.975,3.74 16.527,3.74 19.119,3.74 21.62,3.74 26.7,3.74 29.24,3.74 31.78,3.74 34.32,3.74 36.86,3.74 39.4,3.74 41.94,3.74 44.48,3.74 47.02,3.74 49.56,3.74 24.16,3.797 57.25,4.375 59.125,4.375 60.875,4.375 62.625,4.375 64.375,4.375 1.625,4.875 3.375,4.875 5.125,4.875 92.625,4.875 59,6.125 52.75,6.5 1.625,6.625 3.375,6.625 5.125,6.625 60.75,7.875 53.625,8.125 56.25,8.125 1.625,8.375 3.375,8.375 5.125,8.375 92.625,8.375 38.125,9.625 60.75,9.625 34.25,9.75 1.625,10.125 3.375,10.125 5.125,10.125 29.25,10.375 30.625,10.375 56.25,10.625 48.375,10.75 51,10.75 53.625,10.75 86.875,11.25 26.25,11.375 36.625,11.5 60.75,11.5 63.5,11.5 66.25,11.5 69,11.5 74.375,11.5 76.125,11.5 77.875,11.5 83.125,11.625 1.625,11.875 3.375,11.875 5.125,11.875 92.625,11.875 88.125,12.5 77.875,12.875 84.5,12.875 46.25,13.125 48.75,13.125 51.25,13.125 53.75,13.125 56.25,13.125 60.75,13.25 62.5,13.25 1.625,13.625 3.375,13.625 17.25,13.625 18.25,13.625 89.25,13.625 28,13.875 26.375,14.125 83.125,14.125 86,14.25 39.375,14.875 41,14.875 31.125,15.125 90.625,15.125 1.625,15.375 3.375,15.375 64.25,15.375 92.625,15.375 39.375,15.75 41,15.75 42.25,15.75 49.625,15.875 50.75,15.875 51.75,15.875 16.5,16.625 39.375,16.625 41,16.625 42.25,16.625 43.625,16.625 63,16.625 1.625,17.125 89.25,17.5 62,17.875 26.375,18.125 27.625,18.125 28.625,18.125 31,18.125 32.125,18.125 33.25,18.125 1.625,18.875 37.125,19.125 38.5,19.125 40.25,19.125 42,19.125 43.875,19.125 51.75,19.125 61,19.125 63,19.25 89.25,19.5 43.875,20 49.25,20 51.75,20.125 38.25,20.25 60,20.25 15.875,20.375 1.625,20.625 92.625,20.625 41.375,20.75 43.875,21 61.25,21 63,21 39.125,21.125 49.25,21.125 51.75,21.125 26.125,21.25 36.625,21.5 59,21.5 82.25,21.5 89.25,21.5 14.75,21.625 15.875,21.625 43.875,22 49.25,22.125 40.125,22.25 1.625,22.375 61.25,22.75 63,22.75 57.75,22.875 71.25,23.125 49.25,23.25 38.5,23.375 17.625,23.5 89.25,23.5 78.75,23.625 80.75,23.625 82.25,23.625 1.625,24.125 72.625,24.25 59.5,24.5 61.25,24.5 63,24.5 31,25.125 73.75,25.25 89.25,25.5 82.25,25.625 1.625,25.875 92.625,25.875 70.625,26.75 74.125,26.75 89.25,27.5 1.625,27.625 82.25,27.625 71.125,28.75 74.125,28.75 1.625,29.375 79.25,29.375 89.25,29.5 82.716,30.378 16.125,30.5 71.125,30.75 74.125,30.75 1.625,31.125 92.625,31.125 79.25,31.375 89.25,31.5 16.125,31.875 71.125,32.75 74.125,32.75 1.625,32.875 16.125,33.25 17.625,33.25 13.935,33.315 79.25,33.375 89.25,33.5 1.625,34.625 16.125,34.625 71.125,34.75 74.125,34.75 79.25,35.375 82.693,35.458 89.25,35.5 16.125,36 1.625,36.375 92.625,36.375 71.125,36.75 74.125,36.75 46.5,37.375 48,37.375 79.25,37.375 89.25,37.5 32.375,37.625 34.5,37.625 36.5,37.625 38.625,37.625 40.625,37.625 29.875,38 1.625,38.125 71.125,38.75 74.125,38.75 10.125,39.125 12.75,39.125 15.25,39.125 17.75,39.125 20.25,39.125 89.25,39.5 2,39.875 8.875,40.875 35.875,41 79.375,41.125 3.5,41.375 20.875,41.375 89.25,41.5 15.25,41.625 92.625,41.625 51.25,41.75 49.125,42.125 10.625,42.625 5.125,43 50.125,43 55.875,43 57.5,43 59.125,43 51.25,43.125 79.375,43.125 89.25,43.5 27.25,43.625 60.25,43.625 31.875,43.75 72.95,43.75 47.625,44 54.75,44 15.25,44.25 12.5,44.5 51.25,44.5 35.75,44.625 79.375,44.625 5.125,44.75 48.625,44.875 53.75,44.875 80.5,45.5 89.25,45.5 49.5,45.75 33.5,45.875 36.25,46.125 39,46.125 41.75,46.125 8.75,46.25 81.625,46.25 26.25,46.375 28,46.375 29.625,46.375 5.125,46.5 17.75,46.75 20.75,46.75 53,46.75 55,46.75 92.625,46.875 15.25,47.125 44.625,47.375 89.25,47.5 78.375,47.625 71.75,47.75 51.125,47.875 60,48 45.75,48.5 43.5,48.625 73.875,48.625 59,48.875 79.625,48.875 35.75,49 11.125,49.125 52.375,49.25 55.625,49.375 44.625,49.625 61.875,49.875 63.375,49.875 71.75,49.875 80.625,49.875 58.125,50.125 47.875,50.5 53.625,50.5 73.875,50.75 12.625,50.875 61,51.375 63.375,51.375 31.75,51.625 49,51.625 54.75,51.625 58.125,51.625 26.625,51.75 46.75,51.75 71.75,52 92.625,52.125 20.375,52.375 35.75,52.375 14.125,52.5 61,52.5 63.375,52.5 50.125,52.75 55.875,52.75 73.875,52.875 9.875,53 58.125,53.25 45,53.625 61,53.625 63.375,53.625 34.875,53.75 36.625,53.75 38.375,53.75 40.125,53.75 41.875,53.75 57,53.75 51.25,53.875 25.875,54 28.75,54 15.625,54.125 44,54.625 72.5,54.625 61,54.75 62.125,54.75 63.375,54.75 64.5,54.75 29.875,54.875 58.125,54.875 52.375,55 48.125,55.25 42.875,55.75 71.125,56 73.25,56 75.375,56 77.5,56 53.5,56.125 9.875,56.5 35.875,56.75 54.625,57.25 92.625,57.375 45.75,57.75 48,57.75 50.5,57.75 55.875,58.5 25.75,59 27.875,59 32.25,59 70.875,59 72.5,59 74.125,59 75.75,59 77.375,59 57.875,59.125 85.875,59.125 87.875,59.125 89.75,59.125 60.875,59.25 62.125,59.25 63.375,59.25 64.625,59.25 5.25,59.625 7,59.625 35.75,60 48,60.375 57.875,60.5 92.625,60.875 85.875,61.125 87.875,61.125 89.75,61.125 5.25,61.375 11.5,61.625 31.875,61.875 34.5,61.875 37,61.875 39.5,61.875 42.125,61.875 44.75,61.875 47.25,61.875 49.75,61.875 52.75,61.875 54.25,61.875 56.125,61.875 57.875,61.875 61.25,62.5 5.25,63.125 89.75,63.125 52.75,63.25 54.25,63.25 56.125,63.25 57.875,63.25 61.25,63.75 52.75,64.625 54.25,64.625 56.125,64.625 9.066,64.669 5.25,64.875 59.875,65 61.25,65 89.75,65.125 52.75,66 88.75,66.125 92.625,66.125 58.625,66.25 61.25,66.25 5.25,66.625 52.75,67.375 69.92,67.42 72.46,67.42 75,67.42 77.54,67.42 80.08,67.42 82.62,67.42 16.625,67.5 19.25,67.5 21.75,67.5 24.25,67.5 26.875,67.5 29.375,67.5 57.5,67.5 58.75,67.5 60,67.5 61.25,67.5 6.25,68.625 61.125,69.625 66.375,69.625 71.625,69.625 76.875,69.625 82.125,69.625 87.375,69.625 92.625,69.625 8.75,70 10.5,70 14,70 19.25,70 21,70 24.5,70 28,70 33.25,70 38.5,70 43.75,70 49,70 54.25,70
GND_LM: C11.2 C12.2 D2.3 X?.3 X?.15 X?.16 X?.17 X?.18
NetC1_1: C1.1 C4.1 D3.3 VD1.2 | length 6.5
  Bottom Layer w0.7: D3.3@79.275,17.075 79.325,17.025 79.325,14.75 79.375,14.7 81.5,14.7 VD1.2@81.5,16.675
NetC5_1: C5.1 R2.1 VT1.1 VT1.3 | length 6.2
  Top Layer w0.5: R2.1@118.635,51 118.672,51.037 120.587,51.037 C5.1@120.625,51.075 123.425,51.075 124.175,50.325 124.175,50.275 124.325,50.125 VT1.3@124.375,50.125
NetC5_2: C5.2 R3.1 VT1.2 | length 3.8
  Top Layer w0.5: R3.1@118.635,49.125 118.66,49.15 120.6,49.15 C5.2@120.625,49.175 VT1.2@122.375,49.175
NetC10_1: C10.1 R5.1 VT2.1 VT2.3 | length 6.2
  Top Layer w0.5: R5.1@118.635,45.875 118.672,45.912 120.587,45.912 C10.1@120.625,45.95 123.425,45.95 124.175,45.2 124.175,45.15 124.325,45 VT2.3@124.375,45
NetC10_2: C10.2 R6.1 VT2.2 | length 3.8
  Top Layer w0.5: R6.1@118.635,44 118.66,44.025 120.6,44.025 C10.2@120.625,44.05 ; C10.2@120.625,44.05 VT2.2@122.375,44.05
NetK1_3: K1.3 R18.1 | length 12.6
  Bottom Layer w0.3: K1.3@27.47,35.29 28.93,36.75 36,36.75 37.8,34.95 R18.1@37.8,34
NetK1_10: K1.10 R29.1 | length 12.7
  Bottom Layer w0.3: K1.10@27.47,30.21 28.68,29 36.25,29 37.8,30.55 R29.1@37.8,31.75
NetK1_12: K1.12 VD10.1 VT3.3 | length 7.3
  Bottom Layer w0.5: VT3.3@31.125,32.75 33.25,32.75 34.375,31.625 34.375,30.8 VD10.1@34.575,30.6 ; K1.12@32.55,30.21 32.739,30.21 33.129,30.6 VD10.1@34.875,30.6
NetK2_3: K2.3 R19.1 | length 76.9
  Bottom Layer w0.3: K2.3@27.47,15.54 29.055,17.125 35.375,17.125 39.125,13.375 41.543,13.375 44.875,16.707 44.875,43.047 57.703,55.875 65.125,55.875 67.301,53.699 67.301,52.899 R19.1@67.375,52.825
NetK2_10: K2.10 R30.1 | length 64.1
  Bottom Layer w0.3: K2.10@27.47,10.46 29.055,8.875 35.125,8.875 39.125,12.875 41.75,12.875 45.375,16.5 45.375,40 51.2,45.825 61.75,45.825 R30.1@61.8,45.875
NetK2_12: K2.12 VD11.1 VT4.3 | length 7.3
  Bottom Layer w0.5: VT4.3@31.25,12.875 33.625,12.875 34.55,11.95 34.55,11.273 VD11.1@34.848,10.975 ; K2.12@32.55,10.46 32.76,10.46 33.275,10.975 VD11.1@34.848,10.975 ; VD11.1@34.875,10.975 VD11.1@34.848,10.975
NetK3_3: K3.3 R20.1 | length 78.9
  Bottom Layer w0.3: K3.3@27.47,25.415 28.68,26.625 37.125,26.625 40.001,23.749 41.667,23.749 43.875,25.957 43.875,43.461 57.289,56.875 77.2,56.875 79.125,58.8 79.125,58.85 79.575,59.3 R20.1@79.625,59.3
NetK3_10: K3.10 R31.1 | length 80.1
  Bottom Layer w0.3: K3.10@27.47,20.335 28.68,19.125 35.875,19.125 39.999,23.249 41.874,23.249 44.375,25.75 44.375,43.254 57.496,56.375 69.375,56.375 72.95,52.8 R31.1@72.95,45.875
NetK3_12: K3.12 VD12.1 VT5.3 | length 7.1
  Bottom Layer w0.5: VT5.3@31.5,23 33.25,23 34.488,21.762 34.488,21.148 VD12.1@34.786,20.85 ; K3.12@32.55,20.335 32.794,20.335 33.209,20.75 34.775,20.75 VD12.1@34.875,20.85
NetK4_1: K4.1 K5.1 K6.1 R24.2 | length 18.6
  Top Layer w0.5: R24.2@16.375,58.385 16.385,58.375 K4.1@19.38,58.375
  Bottom Layer w0.3: K6.1@19.38,42.75 K5.1@19.38,50.75 K4.1@19.38,58.375
NetK4_5: K4.5 VD13.1 VT6.3 | length 7.1
  Bottom Layer w0.5: K4.5@29.54,58.375 29.54,58.305 28.542,57.307 28.542,56.25 28.542,55.983 VD13.1@28.65,55.875 28.65,55.929 28.948,56.227 29.598,56.227 30.121,56.75 VT6.3@32.25,56.75 ; VT6.3@32.25,56.708 VT6.3@32.25,56.85
NetK5_5: K5.5 VD14.1 VT7.3 | length 6.5
  Bottom Layer w0.5: VD14.1@28.9,48.25 VD14.1@28.9,48.425 ; K5.5@29.54,50.75 29.54,50.657 28.9,50.017 28.9,48.625 VD14.1@28.9,48.425 ; VT7.3@32.25,49.125 30.625,49.125 30.335,48.835 29.198,48.835 28.9,48.536 VD14.1@28.9,48.425
NetK6_5: K6.5 VD15.1 VT8.3 | length 7.3
  Bottom Layer w0.5: K6.5@29.54,42.75 28.65,41.86 VD15.1@28.65,40 30,40 31,41 VT8.3@32.375,41
NetR7_2: R7.2 READ.1
  other v1: 53.05,37
NetR8_2: R8.2 WRITE.1
  other v1: 53.05,34.875
NetR10_2: R10.2 RELE1.1
  other v1: 17.625,31.825
NetR11_2: R11.2 RELE2.1
  other v1: 17.75,12.075
NetR12_2: R12.2 RELE3.1
  other v1: 17.625,21.95
NetR13_2: R13.2 RELE4.1
  other v1: 37.675,59.875
NetR14_2: R14.2 RELE5.1
  other v1: 37.675,52.25
NetR15_2: R15.2 RELE6.1
  other v1: 37.675,44.25
NetR36_2: R36.2 R42.1 VT3.1 | length 11.4
  Bottom Layer w0.5: R42.1@19.875,33.675 19.875,32.277 R36.2@19.875,31.825 20.175,32.125 28.75,32.125 29.075,31.8 VT3.1@29.125,31.8
NetR37_2: R37.2 R43.1 VT4.1 | length 11.3
  Bottom Layer w0.5: R43.1@20,13.925 R37.2@20,12.075 20.175,12.25 28.875,12.25 29.2,11.925 VT4.1@29.25,11.925
NetR38_2: R38.2 R44.1 VT5.1 | length 11.6
  Bottom Layer w0.5: R44.1@20,23.8 R38.2@20,21.95 20.3,22.25 29.25,22.25 29.45,22.05 VT5.1@29.5,22.05
NetR39_2: R39.2 R45.1 VT6.1 | length 7
  Bottom Layer w0.5: VT6.1@33.2,54.75 37.015,54.75 37.34,55.075 37.425,55.075 37.675,55.325 R39.2@37.675,57.625
NetR40_2: R40.2 R46.1 VT7.1 | length 7
  Bottom Layer w0.5: VT7.1@33.2,47.125 37.1,47.125 37.675,47.7 R46.1@37.675,47.75 R40.2@37.675,50
NetR41_2: R41.2 R47.1 VT8.1 | length 6.9
  Bottom Layer w0.5: VT8.1@33.325,39 36.975,39 37.675,39.7 R47.1@37.675,39.75 R41.2@37.675,42
OSC: R24.1 R28.2 X3.1 | length 12.2
  Top Layer w0.5: X3.1@5.125,54.625 12.21,54.625 14.45,56.865 R28.2@14.5,56.865 R24.1@16.375,56.865
PWM1: K4.7 PWM1.1 X2.5 X4.12 | length 58.5
  Top Layer w0.3: X2.5@10.125,32.045 8.295,32.045 7.5,31.25 6.375,31.25 4.5,33.125 4.5,38.125 22.125,55.75 22.125,62.605 X4.12@22.99,63.47
  Bottom Layer w0.3: X4.12@22.99,63.47 25.71,60.75 32.245,60.75 K4.7@34.62,58.375
PWM1_LM: D2.24 X?.24 | length 2.5
  Top Layer w0.5: X?.24@112.33,66.5 D2.24@114.87,66.5
PWM2: K5.7 PWM2.1 X2.6 X4.13 | length 73.1
  Top Layer w0.3: X2.6@12.665,32.045 11.375,30.755 9.607,30.755 9.602,30.75 9,30.75 7.25,29 6.125,29 4,31.125 4,38.332 21.625,55.957 21.625,62.295 X4.13@20.45,63.47
  Bottom Layer w0.3: X4.13@20.45,63.47 23.795,60.125 25.875,60.125 26.75,59.25 26.75,54.625 28.5,52.875 32.495,52.875 K5.7@34.62,50.75
PWM2_LM: D2.10 X?.10 | length 2.5
  Top Layer w0.5: D2.10@107.25,43.64 X?.10@109.79,43.64